# Altium PCB IT_SENSOR_PCB.PcbDoc (part 2 of 2)
Units mm, origin at the board's own origin, x right, y up, seen from the top; angles counter-clockwise.
Board outline 100 x 100 mm, 4 copper layers (Top Layer, GND, POWER, Bottom Layer), stack 1.576 mm thick; 106 components, 76 nets, 394 pads, 164 vias.
Unrouted connection lines stored in the file: 43.
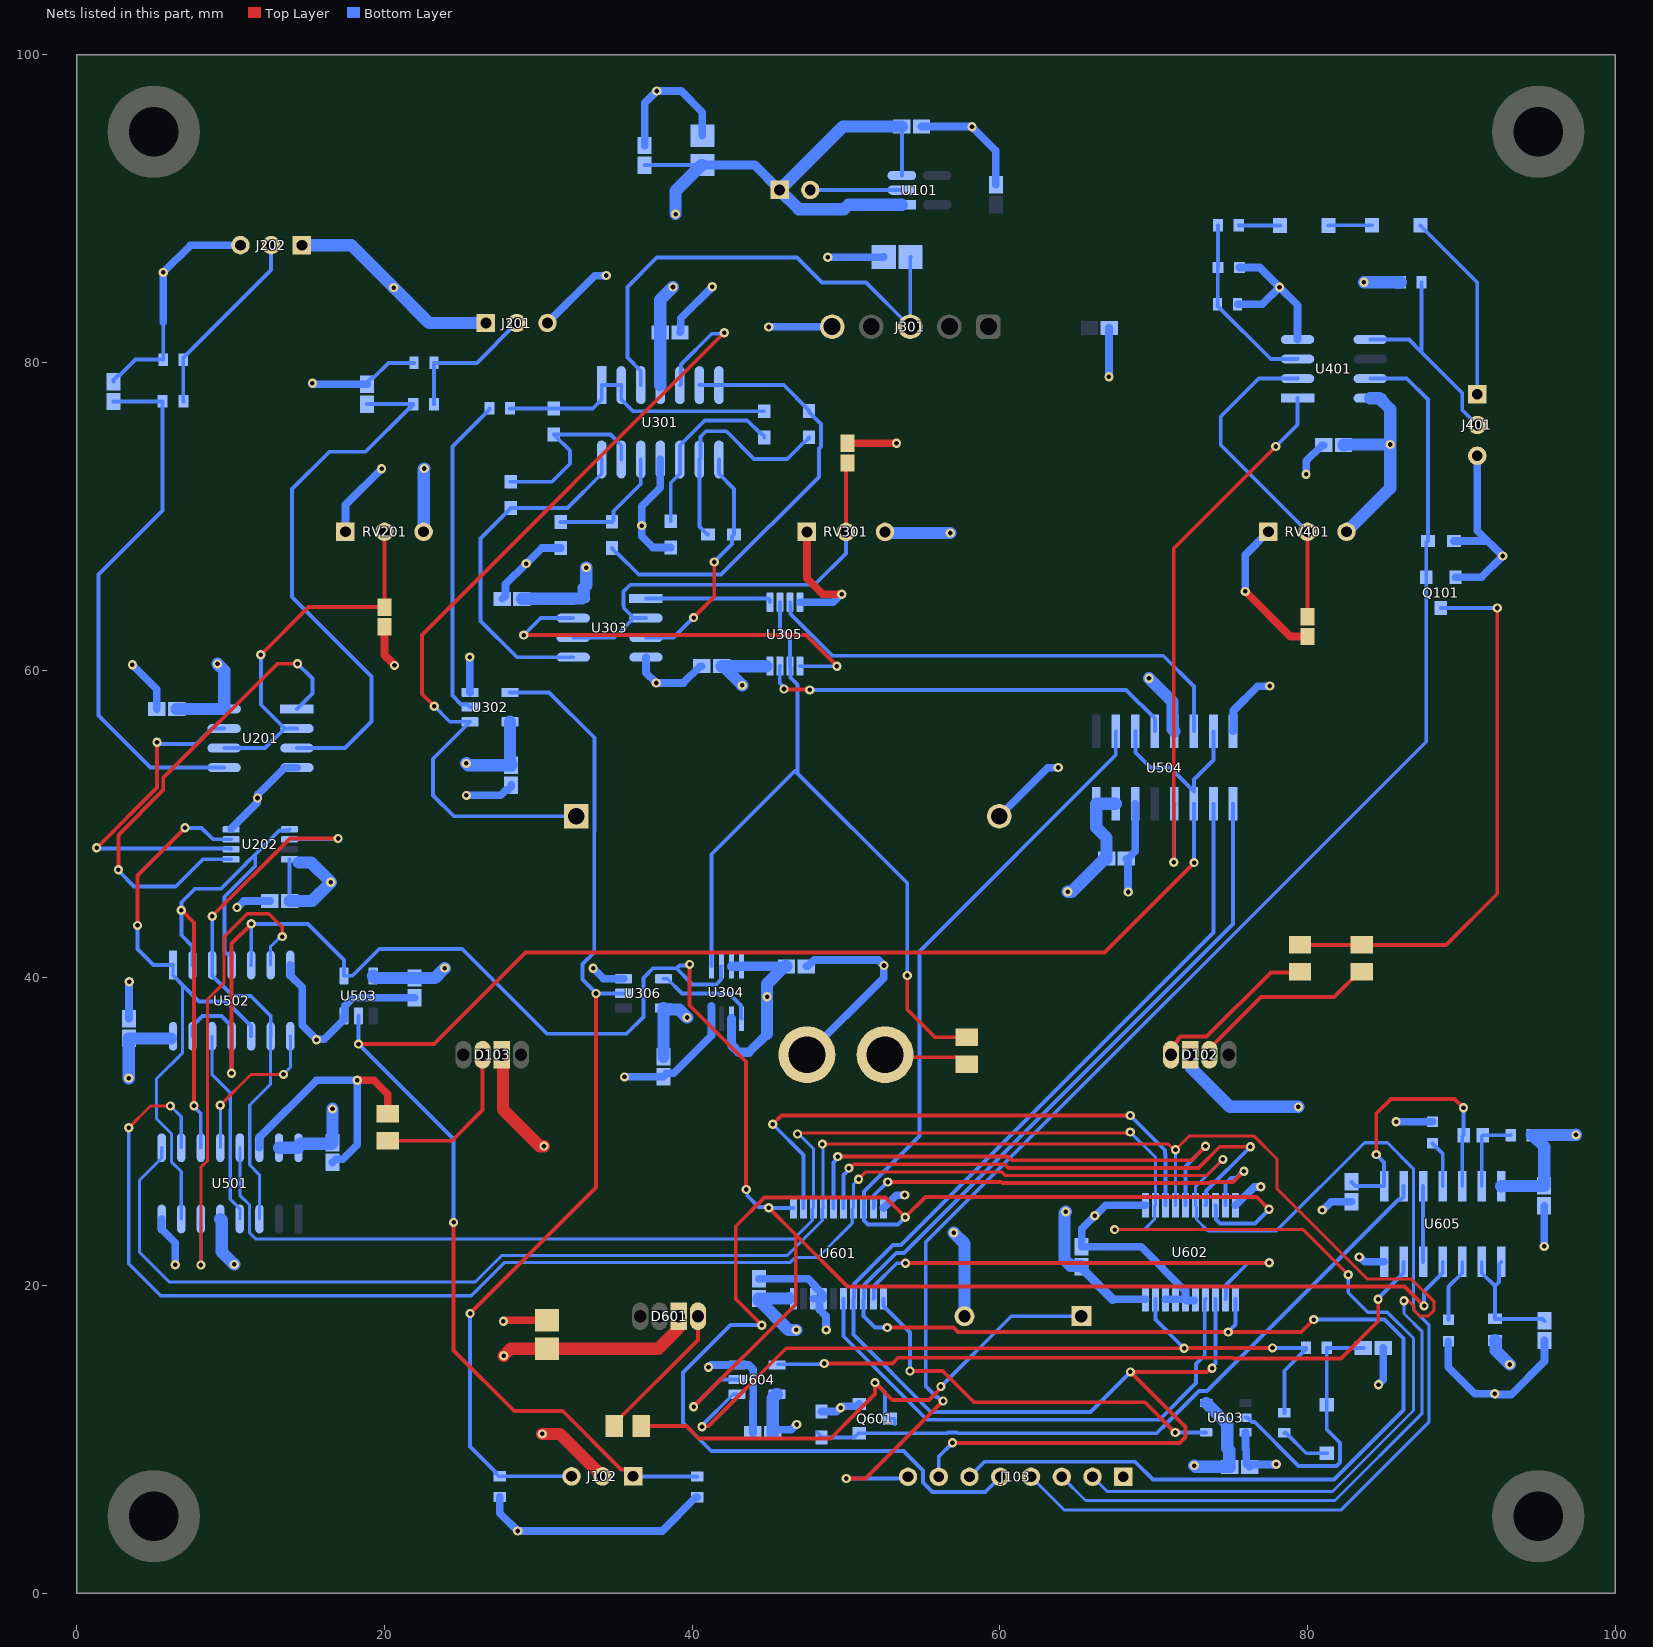
[diagram p4: the nets of this part, all layers, seen from the top]

## Via types
v1: diameter 0.6, hole 0.3, Top Layer to Bottom Layer, 164 vias

## Nets (pads, with @x,y where several pads share a name; then routed paths per layer and width w, separated by ;. In a path a pad name is that pad's centre, name@x,y a point inside that pad or via, vN(x,y) a via of type N, cw(c..) or ccw(c..) an arc to the next point about the centre after c; other vN are vias at no path point) (continued)
+5V: BZ601.2 C101.1 C103.2 C104.1 C204.1 C205.1 C304.1 C305.1 C307.1 C308.1 C309.1 C310.1 C403.1 C501.1 C502.1 C503.1 C504.1 C601.1 C602.1 C604.1 C605.1 C606.1 C611.1 D102.1 D103.1 D601.1 J101.1 J102.2 J201.1 J202.1 R403.2 R602.1 R603.1 RV201.3 RV301.3 RV401.3 U101.1 U101.3 U201.8 U202.8 U301.4 U302.5 U303.8 U304.2 U304.7 U304.8 U305.8 U306.5 U401.8 U501.5 U501.15 U501.16 U502.14 U503.5 U504.5 U504.15 U504.16 U601.20 U602.20 U603.5 U604.5 U605.14 | length 239.7
  Top Layer w0.8: D103.1@27.625,35 27.696,34.929 27.696,31.434 30.07,29.06 v1(30.37,29.06) ; v1(27.75,15.43) 28.214,15.894 C611.1@30.56,15.894 37.812,15.894 39.054,17.137 39.054,17.929 D601.1@39.125,18 ; v1(30.26,10.35) 31.4,10.35 J102.2@34.16,7.59
  Bottom Layer w0.25: U502.14@6.115,36.059 6.25,36.194 U502.14@6.25,36.2 ; C205.1@13.83,44.99 U202.8@13.83,47.705 ; C104.1@36.91,92.829 36.921,92.84 C103.2@40.66,92.84 ; U101.3@53.63,92.16 C101.1@53.629,95.35
  Bottom Layer w0.5: C605.1@45.231,10.41 45.437,10.616 46.429,10.616 46.773,10.96 v1(46.8,10.96) ; 67.33,19.11 U602.20@69.465,19.11
  Bottom Layer w0.6: C103.2@40.66,92.84 44.06,92.84 J101.1@45.68,91.22 ; U304.2@42.555,37.35 42.555,35.635 43.024,35.166 43.686,35.166 44.87,36.35 ; U304.7@42.555,40.75 U304.8@43.205,40.75 C308.1@46.129,40.75 ; C602.1@65.32,21.12 67.33,19.11
  Bottom Layer w0.8: v1(3.37,33.48) 3.37,36.052 C502.1@3.377,36.059 U502.14@6.115,36.059 ; C204.1@6.481,57.48 6.483,57.478 9.574,57.478 U201.8@9.576,57.475 9.576,59.974 v1(9.14,60.41) ; U501.5@9.325,24.324 9.413,24.236 9.413,22.187 v1(10.23,21.37) ; U501.15@13.135,28.956 U501.16@14.405,28.956 14.405,29.09 14.534,29.218 16.564,29.218 16.62,29.275 v1(16.62,31.48) ; C205.1@13.83,44.99 15.29,44.99 v1(16.51,46.21) 15.219,47.501 14.42,47.501 ; J202.1@14.63,87.63 17.84,87.63 v1(20.6,84.87) 22.9,82.57 J201.1@26.59,82.57 ; U503.5@19.26,40.13 19.26,40.091 19.36,39.991 C503.1@21.96,39.991 23.271,39.991 v1(23.91,40.63) ; RV201.3@22.54,68.995 22.54,73.07 v1(22.58,73.11) ; v1(25.31,53.94) 25.439,53.811 C305.1@28.23,53.811 28.23,53.92 28.16,53.99 U302.5@28.16,56.65 ; C307.1@28.931,64.64 28.938,64.647 32.259,64.647 U303.8@32.266,64.655 32.842,64.655 32.951,64.764 32.951,65.34 33.11,65.499 v1(33.11,66.67) ; U301.4@37.93,78.53 C304.1@37.929,81.96 37.929,84.089 v1(38.75,84.91) ; C310.1@38.13,34.861 U306.5@38.13,38.04 38.23,37.94 39.15,37.94 v1(39.67,37.42) ; v1(38.92,89.65) 38.92,91.15 40.61,92.84 C103.2@40.66,92.84 ; v1(43.26,59.01) 43.26,59.02 42.02,60.26 C309.1@41.911,60.26 41.916,60.265 44.82,60.265 ; 44.87,36.35 v1(44.87,38.77) 44.87,39.6 46.02,40.75 C308.1@46.129,40.75 ; C605.1@45.231,10.41 45.231,12.691 45.47,12.93 U604.5@45.52,12.93 ; 46.3,19.18 46.269,19.149 C601.1@44.334,19.149 44.334,19.04 46.264,17.11 v1(46.76,17.11) ; RV301.3@52.54,68.99 52.61,68.92 v1(56.77,68.92) ; U101.1@53.63,90.26 50.165,90.26 49.871,89.966 46.934,89.966 J101.1@45.68,91.22 49.81,95.35 C101.1@53.629,95.35 ; v1(57,23.42) 57.7,22.72 BZ601.2@57.7,18 ; v1(64.29,24.79) 64.21,24.71 64.21,21.674 64.593,21.291 65.264,21.291 65.32,21.235 C602.1@65.32,21.229 ; v1(64.42,45.59) 64.67,45.59 66.83,47.75 C504.1@66.939,47.75 66.939,49.107 66.27,49.777 U504.16@66.27,51.31 U504.15@67.54,51.31 ; v1(69.7,59.48) 71.229,57.951 71.229,56.155 U504.5@71.35,56.034 ; D102.1@72.375,35 72.446,34.929 72.446,34.137 74.973,31.61 v1(79.41,31.61) ; v1(72.64,8.29) 72.72,8.21 C604.1@74.96,8.21 74.921,8.249 74.921,9.289 74.79,9.42 74.79,10.99 U603.5@73.42,12.36 ; C403.1@82.341,74.63 82.381,74.67 v1(85.38,74.67) ; RV401.3@82.54,68.995 85.38,71.835 v1(85.38,74.67) ; v1(83.67,85.22) R403.2@86.067,85.22 ; U401.8@84.084,77.685 84.659,77.685 85.38,76.964 v1(85.38,74.67) ; R602.1@92.19,16.43 92.24,16.38 92.24,15.77 v1(93.15,14.86) ; U605.14@92.6,26.46 92.605,26.465 95.385,26.465 C606.1@95.39,26.47 95.39,29.021 94.631,29.78 R603.1@94.567,29.78 97.45,29.78 v1(97.46,29.79)
ALERT_3S_TIMING: C607.1 R602.2 U605.1 U605.2 | length 9.1
  Bottom Layer w0.25: U605.2@91.33,21.532 91.33,20.821 92.19,19.961 ; U605.1@92.6,21.532 92.446,21.378 92.446,20.217 92.19,19.961 ; C607.1@95.41,17.701 95.281,17.83 R602.2@92.19,17.83 92.19,19.961
ALERT_BLINK: Q601.1 R605.1 U605.9 | length 45.5
  Bottom Layer w0.25: R605.1@48.135,10.435 48.41,10.16 R605.1@48.41,10.11 50.53,10.11 50.81,10.39 Q601.1@50.86,10.39 56.58,10.39 56.639,10.449 57.201,10.449 57.26,10.39 70.18,10.39 70.556,10.766 70.579,10.766 72.952,13.139 73.465,13.139 85.92,25.594 86.096,25.594 86.25,25.749 U605.9@86.25,26.46
ALERT_BLINK_TIMING: C609.1 R604.1 U605.8 U605.12 | length 18.6
  Top Layer w0.25: v1(84.47,28.51) 84.47,31.18 85.42,32.13 89.57,32.13 v1(90.14,31.56)
  Bottom Layer w0.25: C609.1@82.86,26.73 83.13,26.46 U605.8@84.98,26.46 84.98,28 v1(84.47,28.51) ; U605.12@90.06,26.46 90.06,29.675 R604.1@90.155,29.77 90.14,29.785 v1(90.14,31.56)
ALERT_LOAD_N: BZ601.1 Q601.3 R606.2 | length 37.1
  Top Layer w0.25: R606.2@36.685,10.87 39.62,10.87 40.43,10.06 49.01,10.06 50.755,11.805 51.885,12.935 v1(51.885,13.685) 53.01,12.56 55.4,12.56 55.859,13.019 55.859,13.024 56.17,13.335 v1(56.17,13.43)
  Bottom Layer w0.25: v1(51.885,13.685) 52.535,13.035 52.535,11.615 52.81,11.34 Q601.3@52.86,11.34 53.17,11.34 Q601.3@53.17,11 ; v1(56.17,13.43) 60.74,18 BZ601.1@65.3,18
ALERT_TRIG_N: U604.4 U605.6 | length 44.6
  Top Layer w0.25: v1(48.59,14.93) 53.02,14.93 53.389,15.299 75.146,15.299 ; 75.184,15.261 82.181,15.261 84.6,17.68 v1@84.6,19.1
  Bottom Layer w0.25: U604.4@45.57,14.88 v1@48.54,14.88 ; v1@84.59,19.161 86.25,20.821 U605.6@86.25,21.532
  other v1: 84.59,19.11
ALERT_WINDOW: U605.5 U605.10 | length 4.9
  Bottom Layer w0.25: U605.5@87.52,21.532 U605.10@87.52,26.46
BLINK_DISCH: R603.2 R604.2 U605.13 | length 5.2
  Bottom Layer w0.25: U605.13@91.33,26.46 91.33,29.695 R604.2@91.405,29.77 93.203,29.77 R603.2@93.213,29.78
DISP_A_FILT: C201.1 R203.2 U201.3 | length 36
  Bottom Layer w0.25: U201.3@14.304,54.935 17.435,54.935 19.16,56.66 19.16,59.58 13.99,64.75 13.99,71.77 16.42,74.2 18.767,74.2 21.586,77.019 21.662,77.019 21.867,77.223 R203.2@21.867,77.3 C201.1@18.86,77.3
DISP_A_HIGH: U201.1 U202.1 | length 31.3
  Top Layer w0.25: v1(2.7,47.03) 2.7,49.294 5.61,52.204 5.61,53 13.03,60.42 v1(14.34,60.42)
  Bottom Layer w0.25: v1(2.7,47.03) 2.7,46.96 3.72,45.94 6.43,45.94 8.195,47.705 U202.1@10.03,47.705 ; U201.1@14.304,57.475 15.31,58.481 15.31,59.45 v1(14.34,60.42)
DISP_A_RAW: J201.2 R201.1 R203.1 | length 9.1
  Bottom Layer w0.25: R203.1@23.22,77.3 23.215,77.305 23.215,79.975 R201.1@23.21,79.98 26,79.98 J201.2@28.59,82.57
DISP_B_FILT: C202.1 R204.2 U201.5 | length 34.9
  Bottom Layer w0.25: C202.1@2.37,77.469 5.566,77.469 5.567,70.387 1.41,66.23 1.41,57.05 4.78,53.68 9.561,53.68 U201.5@9.576,53.665
DISP_B_HIGH: U201.7 U202.2 | length 22.1
  Top Layer w0.25: v1(1.28,48.45) 1.29,48.45 5.21,52.37 v1(5.21,55.31)
  Bottom Layer w0.25: v1(1.28,48.45) 1.327,48.403 9.982,48.403 U202.2@10.03,48.355 ; v1(5.21,55.31) 5.32,55.2 7.778,55.2 8.783,56.205 U201.7@9.576,56.205
DISP_B_RAW: J202.2 R202.1 R204.1 | length 12.5
  Bottom Layer w0.25: R204.1@6.92,77.47 6.915,77.475 6.915,80.285 6.91,80.29 12.63,86.01 J202.2@12.63,87.63
DISP_CENTER_N: U202.3 U501.7 U502.1 U502.10 | length 39.6
  Top Layer w0.25: v1(3.94,43.41) 3.94,46.66 v1(7.03,49.75)
  Bottom Layer w0.2: U502.1@6.25,40.166 U502.1@6.25,40.832 ; U501.7@6.785,24.324 6.785,27.406 6.14,28.051 6.14,29.881 5.18,30.841 5.18,33.44 6.875,35.135 6.875,39.541
  Bottom Layer w0.25: v1(3.94,43.41) 3.94,41.87 4.98,40.83 6.248,40.83 U502.1@6.25,40.832 ; U502.1@6.25,40.166 6.875,39.541 7.945,38.471 9.725,38.471 11.33,36.866 U502.10@11.33,36.2 ; v1(7.03,49.75) 8.11,49.75 8.855,49.005 U202.3@10.03,49.005
DISP_CENTER_RST_N: U501.6 U502.6 | length 32.6
  Top Layer w0.2: v1(8.06,21.33) 8.06,27.68 8.49,28.11 8.49,38.6 9.571,39.681 9.571,42.666 11.069,44.164 12.476,44.164 13.35,43.29 v1(13.35,42.68)
  Bottom Layer w0.2: U501.6@8.055,24.324 8.058,24.321 8.058,21.332 v1(8.06,21.33) ; U502.6@12.6,40.832 12.6,42.053 12.717,42.17 12.732,42.17 13.242,42.68 v1(13.35,42.68)
DISP_LEFT_N: U202.6 U501.3 U502.3 U502.9 | length 36.2
  Top Layer w0.25: v1(8.8,44.01) 13.85,49.06 v1(16.98,49.06)
  Bottom Layer w0.2: U501.3@11.865,24.324 11.865,27.202 11.24,27.827 11.24,31.737 12.6,33.097 U502.9@12.6,36.2
  Bottom Layer w0.25: v1(8.8,44.01) 8.795,44.005 8.795,40.161 10.145,38.811 11.301,38.811 12.6,37.512 U502.9@12.6,36.2 ; U202.6@13.83,49.005 13.857,49.033 16.953,49.033 v1(16.98,49.06)
DISP_LEFT_RST_N: U501.4 U502.12 | length 12.6
  Bottom Layer w0.2: U502.12@8.79,36.2 8.79,33.7 9.97,32.52 9.97,31.995 9.974,31.991 9.974,31.449 9.97,31.445 9.97,25.615 10.595,24.99 U501.4@10.595,24.324
DISP_RIGHT_N: U202.5 U501.11 U502.2 U502.4 | length 37.7
  Top Layer w0.25: v1(6.79,44.4) 7.61,43.58 v1(7.61,31.68)
  Bottom Layer w0.25: U502.2@7.52,40.832 7.52,42.04 6.79,42.77 6.79,44.91 7.67,45.79 9.358,45.79 10.694,47.126 10.708,47.126 10.959,47.377 10.959,47.391 11.596,48.028 ; v1(7.61,31.68) 7.61,31.615 8.055,31.17 U501.11@8.055,28.956 ; U502.4@10.06,40.832 10.06,41.419 9.925,41.554 9.77,41.554 9.59,41.734 9.59,45.27 11.596,47.276 11.596,48.028 ; U202.5@13.83,49.655 13.759,49.584 13.152,49.584 11.596,48.028
DISP_RIGHT_RST_N: U501.12 U502.8 | length 10.4
  Top Layer w0.2: v1(9.32,31.72) 11.32,33.72 v1(13.43,33.72)
  Bottom Layer w0.2: v1(9.32,31.72) 9.323,31.717 9.323,28.959 U501.12@9.325,28.956 ; v1(13.43,33.72) 13.875,34.165 13.875,36.195 U502.8@13.87,36.2
DISP_VTH: C203.1 RV201.2 U201.2 U201.6 | length 24.9
  Top Layer w0.25: v1(11.96,61) 15.06,64.1 C203.1@20,64.1 RV201.2@20,68.995
  Bottom Layer w0.25: U201.6@9.576,54.935 12.24,54.935 U201.2@13.51,56.205 ; v1(11.96,61) 11.96,57.755 U201.2@13.51,56.205 ; U201.2@14.304,56.205 U201.2@13.51,56.205
FAULT_LED_N: Q101.3 R104.1 R105.2 | length 36.4
  Top Layer w0.25: R104.1@79.52,42.14 R105.2@83.52,42.14 89.01,42.14 92.34,45.47 v1(92.34,64.04)
  Bottom Layer w0.25: Q101.3@88.67,64.04 v1(92.34,64.04)
GND: C101.2 C102.2 C103.1 C104.2 C201.2 C202.2 C203.2 C204.2 C205.2 C301.2 C302.2 C303.2 C304.2 C305.2 C306.2 C307.2 C308.2 C309.2 C310.2 C401.2 C402.2 C403.2 C501.2 C502.2 C503.2 C504.2 C601.2 C602.2 C603.2 C604.2 C605.2 C606.2 C607.2 C608.2 C609.2 C610.2 C611.2 D101.K J101.2 J103.1 J201.3 J202.3 J301.5 J401.3 Q101.2 Q601.2 R101.2 R102.2 R106.2 R107.1 R201.2 R202.2 R303.2 R307.2 R402.2 R605.2 RV201.1 RV301.1 RV401.1 U101.2 U201.4 U202.4 U301.11 U302.3 U303.4 U304.4 U305.4 U306.3 U401.4 U501.8 U501.14 U502.7 U503.3 U504.8 U504.14 U601.10 U601.17 U601.18 U602.1 U602.10 U602.15 U602.16 U602.17 U602.18 U603.3 U604.3 U605.7 | length 316.1
  Top Layer w0.5: v1(18.23,33.34) 19.31,33.34 20.21,32.44 R106.2@20.21,31.155 ; C203.2@20,62.819 20,60.987 20.65,60.337 v1(20.65,60.31) ; v1(27.73,17.67) 27.757,17.67 27.833,17.746 C611.2@30.56,17.746 ; RV301.1@47.46,68.99 47.46,65.97 48.5,64.93 v1(49.72,64.93) ; C306.2@50.11,74.75 v1(53.28,74.75) ; v1(75.95,65.12) 78.881,62.189 C402.2@80.01,62.189
  Bottom Layer w0.25: C202.2@2.37,78.751 2.37,78.86 2.701,79.191 2.811,79.191 3.809,80.19 R202.2@5.61,80.19 5.61,82.61 ; C201.2@18.86,78.691 19.191,79.022 19.301,79.022 20.259,79.98 R201.2@21.91,79.98 ; J101.2@47.68,91.22 47.685,91.215 53.625,91.215 U101.2@53.63,91.21
  Bottom Layer w0.5: C502.2@3.377,37.341 3.389,37.352 3.389,39.729 v1(3.4,39.74) ; v1(3.61,60.35) 5.199,58.761 C204.2@5.199,57.48 ; U501.8@5.515,24.324 5.515,23.658 6.4,22.773 v1(6.4,21.35) ; 5.61,82.61 5.62,82.62 v1(5.62,85.86) 7.39,87.63 J202.3@10.63,87.63 ; U202.4@10.03,49.655 10.03,49.705 11.721,51.396 11.721,51.671 v1(11.74,51.69) 11.759,51.709 11.759,51.914 13.51,53.665 U201.4@14.304,53.665 ; v1(10.41,44.57) 10.437,44.57 10.857,44.99 C205.2@12.549,44.99 ; U501.14@11.865,28.956 11.865,29.622 15.583,33.34 v1(18.23,33.34) 18.23,29.156 17.285,28.21 16.826,28.21 16.62,28.004 C501.2@16.62,27.999 ; U502.7@13.87,40.832 13.884,40.818 13.884,40.152 14.645,39.391 14.645,36.915 v1(15.58,35.98) 15.599,35.999 16.079,35.999 17.36,37.28 U503.3@17.36,37.53 17.41,37.58 17.41,38.163 17.957,38.709 C503.2@21.96,38.709 ; v1(15.31,78.66) 15.337,78.66 15.416,78.581 C201.2@18.86,78.581 ; RV201.1@17.46,68.995 17.46,70.75 v1(19.81,73.1) ; v1(25.32,51.86) 27.561,51.86 27.914,52.214 28.024,52.214 28.23,52.42 C305.2@28.23,52.529 ; v1(25.54,60.85) 25.55,60.84 25.55,58.56 U302.3@25.56,58.55 ; R102.2@27.5,6.243 27.5,5.2 v1(28.66,4.04) 38.05,4.04 40.243,6.233 R101.2@40.32,6.233 ; C307.2@27.649,64.64 27.655,64.64 27.861,64.846 27.861,65.581 v1(29.21,66.93) 30.22,67.94 R307.2@31.45,67.94 ; J201.3@30.59,82.57 33.661,85.641 34.391,85.641 v1(34.41,85.66) ; v1(33.56,40.62) 34.24,39.94 U306.3@35.53,39.94 ; v1(35.6,33.56) 35.61,33.57 38.12,33.57 C310.2@38.13,33.579 38.13,33.585 38.336,33.791 38.795,33.791 41.251,36.247 41.251,38.17 ; C104.2@36.91,94.111 36.91,96.87 v1(37.69,97.65) 39.29,97.65 40.66,96.28 C103.1@40.66,94.74 ; U303.4@36.994,60.845 36.994,59.836 v1(37.66,59.17) 39.43,59.17 40.52,60.26 C309.2@40.629,60.26 ; U301.11@37.93,73.698 37.93,71.86 36.72,70.65 36.72,68.7 37.44,67.98 R303.2@38.61,67.98 ; C304.2@39.211,81.96 39.263,82.013 39.263,82.873 v1@41.291,84.901 ; v1(41.06,14.69) 41.087,14.69 41.227,14.83 U604.3@42.92,14.83 43.68,14.83 43.974,14.536 43.974,12.451 43.949,12.427 C605.2@43.949,10.41 ; C601.2@44.334,20.431 47.547,20.431 47.987,19.99 47.987,19.933 48.529,19.391 U601.17@48.529,19.14 U601.18@47.879,19.14 ; v1(44.98,82.31) 44.99,82.32 49.09,82.32 J301.5@49.1,82.33 ; U305.4@47.005,64.415 49.178,64.415 49.693,64.93 v1(49.72,64.93) ; C308.2@47.411,40.75 47.52,40.75 47.93,41.16 52.11,41.16 v1(52.47,40.8) 52.451,40.781 52.451,39.991 D101.K@47.46,35 ; 48.28,18.86 48.28,18.43 48.701,18.009 48.701,17.129 v1(48.72,17.11) ; R605.2@48.41,11.81 49.383,11.81 49.623,12.05 v1(49.65,12.05) 49.677,12.05 49.767,12.14 50.71,12.14 Q601.2@50.86,12.29 ; v1(48.82,86.85) 52.452,86.85 C301.2@52.462,86.86 ; U601.10@52.429,25.04 52.454,25.04 53.275,25.861 53.801,25.861 v1(53.82,25.88) ; C101.2@54.911,95.35 54.921,95.34 58.18,95.34 59.74,93.78 C102.2@59.74,91.551 ; C303.2@59.96,50.5 63.111,53.651 63.781,53.651 v1(63.8,53.67) ; v1(67.09,79.08) 67.101,79.091 67.101,82.239 C302.2@67.111,82.25 ; v1(68.35,45.58) 68.331,45.599 68.331,47.64 C504.2@68.221,47.75 68.33,47.75 68.81,48.23 U504.14@68.81,51.31 ; U602.1@69.465,25.21 66.877,25.21 66.197,24.53 v1(66.17,24.53) 65.32,23.68 C602.2@65.32,22.511 69.189,22.511 72.065,19.635 U602.16@72.065,19.11 ; U602.18@70.765,19.11 U602.17@71.415,19.11 U602.16@72.065,19.11 ; U602.15@72.63,19.02 72.155,19.02 U602.16@72.065,19.11 ; U504.8@75.16,56.034 75.189,56.064 75.189,57.379 76.761,58.951 77.531,58.951 v1(77.55,58.97) ; U602.10@75.315,25.21 75.34,25.21 76.531,26.401 76.941,26.401 v1(76.96,26.42) ; R402.2@75.46,83.78 77.07,83.78 v1(78.18,84.89) ; C401.2@75.58,86.18 76.89,86.18 v1(78.18,84.89) ; v1(75.95,65.12) 75.95,67.485 RV401.1@77.46,68.995 ; U603.3@75.97,10.46 75.97,9.37 76.03,9.31 76.03,8.416 76.236,8.21 C604.2@76.241,8.21 76.392,8.361 77.951,8.361 v1(77.97,8.38) ; U401.4@79.356,81.495 79.356,83.714 v1(78.18,84.89) ; v1(79.91,72.73) 79.929,72.749 79.929,73.609 80.95,74.63 C403.2@81.059,74.63 ; v1(80.96,24.9) 80.987,24.9 81.536,25.449 C609.2@82.86,25.449 ; v1(83.37,21.85) 83.397,21.85 83.715,21.532 U605.7@84.98,21.532 ; v1@84.62,13.577 84.92,13.877 C603.2@84.92,15.94 ; v1(85.76,30.64) C610.2@88.13,30.64 ; C608.2@89.16,16.37 89.16,14.68 90.88,12.96 92.197,12.96 92.249,12.908 93.238,12.908 95.41,15.08 C607.2@95.41,16.419 ; R107.1@89.53,68.4 91.71,68.4 ; Q101.2@89.62,66.04 91.31,66.04 v1(92.69,67.42) 91.04,69.07 J401.3@91.04,73.94 ; v1(95.39,22.54) C606.2@95.39,25.189
  other v1: 92.17,12.96 84.62,13.55 36.72,69.4 41.31,84.92 58.19,95.33
NetC608_1: C608.1 U605.3 | length 4.1
  Bottom Layer w0.25: C608.1@89.16,17.77 89.16,19.921 90.06,20.821 U605.3@90.06,21.532
NetC610_1: C610.1 U605.11 | length 3.1
  Bottom Layer w0.25: C610.1@88.13,29.24 88.79,28.58 U605.11@88.79,26.46
NetD101_A: D101.A R103.2 | length 5.6
  Top Layer w0.25: D101.A@52.54,35 52.705,34.835 57.4,34.835 R103.2@57.85,34.385
NetD102_2: D102.2 R104.2 | length 10.9
  Top Layer w0.25: D102.2@71.125,35 71.125,35.471 71.575,35.921 71.575,36.014 71.736,36.175 73.445,36.175 77.625,40.355 R104.2@79.485,40.355
NetD102_3: D102.3 R105.1 | length 12.4
  Top Layer w0.25: D102.3@73.625,35 73.625,35.403 76.972,38.75 81.73,38.75 83.37,40.39 R105.1@83.52,40.39
NetD103_3: D103.3 R106.1 | length 10.6
  Top Layer w0.25: R106.1@20.21,29.405 24.375,29.405 26.38,31.41 26.38,34.995 D103.3@26.375,35
NetD401_2: D401.2 D402.1 | length 2.8
  Bottom Layer w0.25: D402.1@81.37,88.91 81.38,88.92 D401.2@84.205,88.92
NetD402_2: D402.2 R401.1 | length 2.7
  Bottom Layer w0.25: R401.1@75.537,88.91 D402.2@78.22,88.91
NetD601_2: D601.2 R606.1 | length 9.4
  Top Layer w0.25: R606.1@34.935,10.87 34.935,11.02 40.375,16.46 D601.2@40.375,18
NetD602_2: D602.2 R607.1 | length 3.3
  Bottom Layer w0.25: R607.1@78.5,10.42 78.6,10.42 79.925,9.095 D602.2@81.26,9.095
NetR301_2: R301.2 U302.2 | length 21.1
  Bottom Layer w0.25: U302.2@25.56,57.6 25.385,57.775 24.979,57.775 24.41,58.344 24.41,74.54 26.813,76.943 R301.2@26.813,77.02
NetR302_2: R302.2 R303.1 U301.10 | length 11.8
  Bottom Layer w0.25: R303.1@38.61,69.68 38.61,72.182 39.2,72.772 U301.10@39.2,73.698 39.2,74.624 40.816,76.24 43.58,76.24 44.365,75.455 44.415,75.455 44.69,75.18 R302.2@44.69,75.13
NetR304_2: R304.2 R305.1 U301.9 | length 15.2
  Bottom Layer w0.25: R305.1@41.03,68.82 40.98,68.82 40.47,69.33 U301.9@40.47,73.698 40.541,73.769 40.541,75.171 40.9,75.53 42.22,75.53 44.02,73.73 46.18,73.73 47.265,74.815 47.315,74.815 47.59,75.09 R304.2@47.59,75.14
NetR306_2: R306.2 R307.1 U301.12 | length 8.2
  Bottom Layer w0.25: R307.1@31.45,69.64 34.78,69.64 34.889,69.749 34.889,70.329 36.66,72.1 U301.12@36.66,73.698
NetR308_2: R308.2 R309.1 U301.13 | length 12.3
  Bottom Layer w0.25: R309.1@28.2,72.25 30.88,72.25 32.05,73.42 32.05,74.27 R308.2@31,75.32 31.006,75.314 34.7,75.314 35.39,74.624 U301.13@35.39,73.698
PREV_DISP_CENTER: U601.5 U602.5 | length 32.2
  Top Layer w0.25: v1(49.47,28.38) 60.513,28.38 60.752,28.141 72.466,28.141 73.37,29.045 v1(73.37,29.05)
  Bottom Layer w0.25: U601.5@49.179,25.04 49.179,27.994 49.47,28.285 v1(49.47,28.38) ; U602.5@72.065,25.21 72.065,27.745 v1(73.37,29.05)
PREV_DISP_LEFT: U601.2 U602.3 | length 36.5
  Top Layer w0.25: v1(45.24,30.48) 45.81,31.05 v1(68.48,31.05)
  Bottom Layer w0.25: v1(45.24,30.48) 47.229,28.491 U601.2@47.229,25.04 ; v1(68.48,31.05) 70.741,28.789 70.741,28.539 70.765,28.515 U602.3@70.765,25.21
PREV_DISP_RIGHT: U601.6 U602.7 | length 34.6
  Top Layer w0.25: v1(50.19,27.63) 50.265,27.63 50.511,27.876 60.305,27.876 60.551,27.63 72.49,27.63 72.497,27.637 72.917,27.637 74.3,29.02 v1(76.29,29.02)
  Bottom Layer w0.25: U601.6@49.829,25.04 49.829,27.174 50.19,27.535 v1(50.19,27.63) ; U602.7@73.365,25.21 73.411,25.256 73.411,26.141 v1(76.29,29.02)
PREV_TILT_LEFT: U601.9 U602.9 | length 28.5
  Top Layer w0.25: v1(52.72,26.73) 60.096,26.73 60.154,26.672 73.659,26.672 73.717,26.73 75.17,26.73 v1(75.87,27.43)
  Bottom Layer w0.25: U601.9@51.779,25.04 51.825,25.086 51.825,25.868 52.687,26.73 v1(52.72,26.73) ; U602.9@74.665,25.21 74.665,26.625 75.034,26.994 75.351,26.994 75.787,27.43 v1(75.87,27.43)
PREV_TILT_RIGHT: U601.12 U602.12 | length 31.5
  Top Layer w0.25: v1(53.87,21.44) 53.89,21.46 77.49,21.46 v1(77.51,21.48)
  Bottom Layer w0.25: U601.12@51.779,19.14 51.825,19.186 51.825,19.968 53.297,21.44 v1(53.87,21.44) ; U602.12@74.665,19.11 74.711,19.156 74.711,20.038 76.153,21.48 v1(77.51,21.48)
PREV_VIBRATION: U601.15 U602.14 | length 34.3
  Bottom Layer w0.25: U601.15@49.829,19.14 49.829,16.701 55.26,11.27 70.37,11.27 72.761,13.661 72.761,14.901 73.319,15.459 73.319,19.064 U602.14@73.365,19.11
REF_OK: R103.1 U304.5 U305.2 U305.6 | length 49.7
  Top Layer w0.25: v1(53.98,40.15) 53.98,37.94 55.785,36.135 R103.1@57.85,36.135
  Bottom Layer w0.25: U304.5@41.255,40.75 41.255,48.032 46.68,53.458 46.85,53.288 ; U305.2@45.705,64.415 45.705,62.688 46.355,62.038 U305.6@46.355,60.265 46.401,60.219 46.401,59.509 46.85,59.06 46.85,53.288 ; v1(53.98,40.15) 53.98,46.157 46.85,53.288
REF_SET: J102.3 R102.1 U302.4 U306.2 | length 66
  Top Layer w0.25: v1(25.56,18.18) 33.75,26.37 v1(33.75,38.98)
  Bottom Layer w0.25: v1(25.56,18.18) 25.56,9.537 27.219,7.878 27.219,7.801 27.423,7.597 R102.1@27.5,7.597 27.503,7.593 32.157,7.593 J102.3@32.16,7.59 ; U302.4@28.16,58.55 30.7,58.55 33.639,55.611 33.639,49.543 33.63,49.534 33.63,41.65 32.881,40.901 32.881,39.885 33.776,38.99 U306.2@35.53,38.99
REF_SET_N: U304.1 U306.4 | length 6.6
  Bottom Layer w0.25: U306.4@38.13,39.94 38.38,39.94 39.332,38.988 42.403,38.988 43.18,38.211 43.18,37.375 U304.1@43.205,37.35
RESET: J102.1 R101.1 U503.2 U504.3 U504.7 U504.11 | length 117.3
  Top Layer w0.25: v1(18.31,35.69) 23.21,35.69 29.163,41.643 66.813,41.643 72.63,47.46 v1(72.63,47.49) ; v1(24.49,24.1) 24.49,15.78 28.434,11.836 31.584,11.836 35.38,8.04 35.71,8.04 J102.1@36.16,7.59
  Bottom Layer w0.25: U503.2@18.31,37.53 v1(18.31,35.69) 24.49,29.51 v1(24.49,24.1) ; J102.1@36.16,7.59 36.163,7.587 R101.1@40.32,7.587 ; U504.3@68.81,56.034 68.81,54.66 69.798,53.672 71.071,53.672 72.62,52.123 72.62,52.9 73.89,54.17 U504.7@73.89,56.034 ; U504.11@72.62,51.31 72.625,51.305 72.625,47.495 v1(72.63,47.49)
RESET_N: U304.6 U502.5 U502.11 U502.13 U503.4 U601.1 U604.2 U605.4 | length 146.9
  Top Layer w0.25: v1(10.05,33.79) 10.05,42.22 v1(11.34,43.51) ; v1(39.83,40.87) 39.83,38.22 43.51,34.54 v1(43.51,26.24) ; v1(40.09,12.12) 46.73,18.76 46.73,23.3 ; v1(44.985,25.045) 46.73,23.3 ; v1(87.58,18.67) 86.31,19.94 50.09,19.94 46.73,23.3
  Bottom Layer w0.25: U502.13@7.52,36.2 7.52,36.866 8.17,37.516 9.41,37.516 10.06,36.866 U502.11@10.06,36.2 10.055,36.195 10.055,33.795 v1(10.05,33.79) ; U502.5@11.33,40.832 11.335,40.837 11.335,43.505 v1(11.34,43.51) 15.02,43.51 17.36,41.17 U503.4@17.36,40.13 17.904,40.13 19.654,41.88 25.05,41.88 30.57,36.36 35.73,36.36 36.83,37.46 36.83,39.996 37.453,40.619 38.983,40.619 ; v1(39.83,40.87) 39.763,40.803 39.167,40.803 38.983,40.619 ; v1(40.09,12.12) 41.85,13.88 U604.2@42.92,13.88 ; U304.6@41.905,40.75 41.88,40.725 41.88,39.889 41.562,39.571 40.031,39.571 38.983,40.619 ; v1(43.51,26.24) 43.577,26.173 43.577,25.853 44.318,25.112 44.918,25.112 v1(44.985,25.045) ; v1@44.99,25.04 U601.1@46.579,25.04 ; v1(87.58,18.67) 87.58,19.611 88.79,20.821 U605.4@88.79,21.532
RISK_MEM_DISP_CENTER: J103.3 U501.9 U601.4 U602.4 | length 146.3
  Top Layer w0.2: v1(48.465,29.192) 70.94,29.192 71.312,28.82 v1(71.42,28.82) 72.304,29.704 76.531,29.704 78.014,28.221 78.014,26.281 83.876,20.419 86.756,20.419 88.234,18.941 88.234,18.399 87.851,18.016 87.309,18.016 86.926,18.399 86.926,18.647 86.416,19.156 v1(86.27,19.01)
  Bottom Layer w0.2: U501.9@5.515,28.956 5.515,28.29 4.08,26.855 4.08,22.14 6,20.22 25.894,20.22 27.634,21.96 46.196,21.96 48.458,24.222 48.458,24.969 48.539,25.051 48.497,25.093 48.497,29.16 v1(48.465,29.192) ; J103.3@64.03,7.56 65.57,6.02 81.79,6.02 87.456,11.686 87.456,16.994 86.27,18.18 v1(86.27,19.01) ; U602.4@71.415,25.21 71.418,25.212 71.418,28.818 v1(71.42,28.82)
RISK_MEM_DISP_LEFT: J103.2 U501.13 U601.3 U602.2 | length 131.3
  Top Layer w0.2: v1(46.85,29.846) 46.912,29.908 68.418,29.908 v1(68.48,29.97) ; v1(67.46,23.63) 79.72,23.63 v1(82.65,20.7)
  Bottom Layer w0.2: U501.13@10.595,28.956 10.595,25.874 11.22,25.249 11.22,23.419 11.606,23.033 46.618,23.033 47.808,24.222 47.808,24.969 U601.3@47.879,25.04 47.879,28.901 46.934,29.846 v1(46.85,29.846) ; J103.2@66.03,7.56 66.984,6.606 81.622,6.606 86.89,11.874 86.89,16.565 85.196,18.259 83.921,18.259 82.65,19.53 v1(82.65,20.7) ; v1(67.46,23.63) 69.382,23.63 70.044,24.292 70.044,25.139 U602.2@70.115,25.21 70.115,28.335 v1(68.48,29.97)
RISK_MEM_DISP_RIGHT: J103.4 U501.10 U601.7 U602.6 | length 160.6
  Top Layer w0.2: v1(3.37,30.26) 4.78,31.67 v1(6.08,31.67) ; v1(50.82,26.91) 51.294,27.384 60.119,27.384 60.352,27.151 73.461,27.151 v1(74.505,28.195)
  Bottom Layer w0.2: v1(3.37,30.26) 3.37,21.41 5.45,19.33 25.646,19.33 27.822,21.506 46.384,21.506 46.698,21.82 48.18,21.82 50.408,24.048 50.408,24.969 U601.7@50.479,25.04 50.479,26.569 v1(50.82,26.91) ; v1(6.08,31.67) 6.785,30.965 U501.10@6.785,28.956 ; J103.4@62.03,7.56 64.2,5.39 82.17,5.39 87.91,11.13 87.91,17.415 86.887,18.438 86.887,27.594 85.201,29.28 83.703,29.28 77.975,23.552 73.526,23.552 72.786,24.292 72.786,25.139 U602.6@72.715,25.21 72.715,26.405 v1(74.505,28.195)
RISK_MEM_TILT_LEFT: J103.5 U504.2 U601.8 U602.8 | length 123.5
  Top Layer w0.25: v1(44.52,17.42) 42.83,19.11 42.83,23.85 44.704,25.724 45.266,25.724 52.566,25.724 v1(53.85,24.44) 55.16,25.75 76.7,25.75 v1(77.5,24.95)
  Bottom Layer w0.25: v1(44.52,17.42) 42.48,17.42 39.411,14.351 39.411,11.079 41.243,9.247 53.727,9.247 55.009,7.966 55.009,7.197 55.624,6.581 59.051,6.581 J103.5@60.03,7.56 ; v1(53.85,24.44) 53.371,23.961 51.426,23.961 51.175,24.212 51.175,24.994 U601.8@51.129,25.04 51.175,25.086 51.175,26.115 54.769,29.709 54.769,41.717 67.54,54.488 U504.2@67.54,56.034 ; U602.8@74.015,25.21 74.061,25.164 74.061,24.282 74.312,24.031 76.581,24.031 v1(77.5,24.95)
RISK_MEM_TILT_RIGHT: J103.6 U504.9 U601.13 U602.11 | length 117.9
  Top Layer w0.25: v1(52.68,17.26) 56.985,17.26 57.275,16.97 v1(74.85,16.97) 79.6,16.97 v1(80.41,17.78)
  Bottom Layer w0.25: v1(52.68,17.26) 51.89,17.26 51.129,18.021 U601.13@51.129,19.14 51.175,19.186 51.175,20.031 53.263,22.119 53.779,22.119 75.16,43.5 U504.9@75.16,51.31 ; J103.6@58.03,7.56 59.009,8.539 68.787,8.539 69.951,7.375 81.714,7.375 86.235,11.896 86.235,16.543 84.998,17.78 v1(80.41,17.78) ; v1(74.85,16.97) 74.85,16.995 75.315,17.46 U602.11@75.315,19.11
RISK_MEM_VIBRATION: J103.7 U504.10 U601.14 U602.13 | length 99.3
  Top Layer w0.25: v1(56.92,9.77) 56.929,9.761 71.681,9.761 72.079,10.159 72.079,10.791 v1(68.49,14.38) 73.465,14.38 73.705,14.62 v1(73.8,14.62)
  Bottom Layer w0.25: J103.7@56.03,7.56 56.03,8.88 v1(56.92,9.77) ; v1(68.49,14.38) 65.884,11.774 55.506,11.774 50.479,16.801 U601.14@50.479,19.14 50.525,19.186 50.525,20.093 53.054,22.623 53.57,22.623 73.89,42.943 U504.10@73.89,51.31 ; v1(73.8,14.62) 73.8,14.715 74.015,14.93 U602.13@74.015,19.11
RISK_MISMATCH: R601.1 R607.2 U602.19 U604.1 | length 53.4
  Top Layer w0.25: v1(40.64,10.81) 40.682,10.852 41.052,10.852 46.12,15.92 v1(71.98,15.92) ; v1@71.98,15.94 v1(77.73,15.94)
  Bottom Layer w0.25: v1(40.64,10.81) 40.64,10.9 42.67,12.93 U604.1@42.92,12.93 ; U602.19@70.115,19.11 70.115,17.785 v1(71.98,15.92) ; v1(77.73,15.94) R601.1@79.903,15.94 79.903,15.863 78.5,14.46 R607.2@78.5,11.72
RISK_UPDATE_CLK: U601.11 U603.4 | length 26.3
  Top Layer w0.25: v1(54.16,14.44) 56.29,14.44 58.32,12.41 69.43,12.41 v1(71.4,10.44)
  Bottom Layer w0.25: U601.11@52.429,19.14 52.429,18.665 54.16,16.934 v1(54.16,14.44) ; v1(71.4,10.44) 71.41,10.45 73.41,10.45 U603.4@73.42,10.46
RISK_UPDATE_DELAY: C603.1 D602.1 R601.2 U603.2 | length 17.7
  Bottom Layer w0.25: U603.2@75.97,11.41 76.095,11.41 76.391,11.114 76.57,11.114 79.418,8.266 81.892,8.266 82.114,8.488 82.114,9.775 81.257,10.633 R601.2@81.257,15.94 C603.1@83.639,15.94
SENSOR_FAULT: J103.8 Q101.1 R107.2 U401.7 | length 95.9
  Top Layer w0.25: v1(50.02,7.45) 51.27,7.45 v1(56.31,12.49)
  Bottom Layer w0.25: v1(50.02,7.45) 53.92,7.45 J103.8@54.03,7.56 ; v1(56.31,12.49) 56.215,12.49 55.954,12.751 55.889,12.751 55.18,13.46 55.18,22.807 87.72,55.347 Q101.1@87.72,66.04 87.72,68.29 R107.2@87.83,68.4 87.83,77.59 86.45,78.97 84.099,78.97 U401.7@84.084,78.955
TILT_HOLD: C303.1 U301.5 U302.1 | length 56.2
  Top Layer w0.25: v1(23.23,57.66) 22.43,58.46 22.43,62.29 v1(42.08,81.94)
  Bottom Layer w0.25: v1(23.23,57.66) 24.24,56.65 U302.1@25.56,56.65 23.15,54.24 23.15,51.86 24.51,50.5 C303.1@32.46,50.5 ; U301.5@39.2,78.53 39.263,78.593 39.263,79.863 41.273,81.873 42.013,81.873 v1(42.08,81.94)
TILT_LEFT: U305.7 U504.4 | length 27.3
  Top Layer w0.25: v1(45.97,58.78) 46,58.75 47.61,58.75 v1(47.64,58.72)
  Bottom Layer w0.25: U305.7@45.705,60.265 45.698,60.257 45.698,59.147 45.97,58.875 v1(45.97,58.78) ; v1(47.64,58.72) 68.207,58.72 70.08,56.847 U504.4@70.08,56.034
TILT_LEFT_RAW: U303.1 U305.1 | length 8.2
  Bottom Layer w0.25: U303.1@36.994,64.655 44.955,64.655 45.055,64.555 U305.1@45.055,64.415
TILT_NEG_AMP: R309.2 U301.14 U303.5 | length 22.9
  Bottom Layer w0.25: U303.5@32.266,60.845 28.595,60.845 26.25,63.19 26.25,68.55 28.2,70.5 R309.2@28.2,70.55 31.898,70.55 34.12,72.772 U301.14@34.12,73.698
TILT_POS_AMP: R305.2 U301.8 U303.3 | length 15.4
  Top Layer w0.25: v1(40.09,63.42) 41.43,64.76 v1(41.43,67.03)
  Bottom Layer w0.25: U303.3@36.994,62.115 38.785,62.115 v1(40.09,63.42) ; v1(41.43,67.03) 42.591,68.191 42.591,68.681 R305.2@42.73,68.82 42.73,71.782 41.74,72.772 U301.8@41.74,73.698
TILT_REF: R304.1 R306.1 U301.6 U301.7 | length 29.3
  Bottom Layer w0.25: R306.1@34.79,67.95 34.79,67.9 35.065,67.625 35.115,67.625 36.53,66.21 41.88,66.21 48.24,72.57 48.24,74.404 48.369,74.533 48.369,76.011 47.59,76.79 47.59,76.89 45.95,78.53 U301.7@41.74,78.53 U301.6@40.47,78.53
TILT_RIGHT: U305.3 U504.6 | length 31.9
  Bottom Layer w0.25: U305.3@46.355,64.415 46.401,64.369 46.401,63.662 49.124,60.939 70.621,60.939 72.62,58.94 U504.6@72.62,56.034
TILT_RIGHT_RAW: U303.7 U305.5 | length 27.3
  Top Layer w0.25: v1(29.05,62.28) 47.39,62.28 v1(49.41,60.26)
  Bottom Layer w0.25: v1(29.05,62.28) 30.155,63.385 U303.7@32.266,63.385 ; U305.5@47.005,60.265 47.01,60.26 v1(49.41,60.26)
TILT_VTH: C306.1 RV301.2 U303.2 U303.6 | length 28.7
  Top Layer w0.25: RV301.2@50,68.995 50,73.359 C306.1@50.11,73.469
  Bottom Layer w0.25: U303.6@32.266,62.115 34.93,62.115 U303.2@36.2,63.385 ; U303.2@36.994,63.385 U303.2@36.2,63.385 ; RV301.2@50,68.99 50,67.59 47.96,65.55 35.977,65.55 35.53,65.103 35.53,64.207 35.55,64.187 35.55,64.035 U303.2@36.2,63.385
TILT_Y_BUF: R301.1 R302.1 R308.1 U301.1 U301.2 | length 18.9
  Bottom Layer w0.25: R301.1@28.167,77.02 R308.1@31,77.02 33.536,77.02 34.12,77.604 U301.1@34.12,78.53 U301.2@35.39,78.53 35.39,77.604 36.164,76.83 R302.1@44.69,76.83
TILT_Y_RAW: C301.1 J301.3 U301.3 | length 32.3
  Bottom Layer w0.25: U301.3@36.66,78.53 36.66,79.456 35.79,80.326 35.79,84.91 37.7,86.82 46.81,86.82 48.43,85.2 51.31,85.2 J301.3@54.18,82.33 54.18,86.85 C301.1@54.19,86.86
VIB_CONN_SENSE: J401.2 R403.1 U401.5 | length 14.5
  Bottom Layer w0.25: U401.5@84.084,81.495 86.595,81.495 87.42,80.67 ; R403.1@87.42,85.22 87.42,80.67 ; J401.2@91.04,75.94 90.061,76.919 90.061,78.029 87.42,80.67
VIB_FILT: C401.1 R401.2 R402.1 U401.3 | length 11.9
  Bottom Layer w0.25: R401.2@74.183,88.91 74.182,88.908 74.182,86.182 C401.1@74.18,86.18 74.17,86.17 74.17,83.79 R402.1@74.16,83.78 74.16,83.68 77.615,80.225 U401.3@79.356,80.225
VIB_SENSOR_RAW: D401.1 J401.1 | length 12.5
  Bottom Layer w0.25: D401.1@87.355,88.92 87.355,88.895 91.04,85.21 J401.1@91.04,77.94
VIB_VTH: C402.1 RV401.2 U401.2 | length 21.4
  Top Layer w0.25: RV401.2@80,68.995 80,63.48 C402.1@80.01,63.47
  Bottom Layer w0.25: U401.2@79.356,78.955 76.835,78.955 74.36,76.48 74.36,74.635 RV401.2@80,68.995
VIBRATION_RAW: U401.1 U504.12 | length 37.3
  Top Layer w0.25: v1(71.31,47.51) 71.31,67.91 v1(77.94,74.54)
  Bottom Layer w0.25: v1(71.31,47.51) 71.33,47.53 71.33,51.29 U504.12@71.35,51.31 ; v1(77.94,74.54) 79.356,75.956 U401.1@79.356,77.685
pads on no net: D102.4 D103.2 D103.4 D601.3 D601.4 J301.2 J301.4 U101.4 U202.7 U304.3 U306.1 U501.1 U501.2 U503.1 U504.1 U504.13 U601.16 U601.19 U603.1

## Polygon pours and split planes (outlines as drawn)
GND on GND (split plane): 99.49,0.51 0.51,0.51 0.51,99.49 99.49,99.49
+5V on POWER (split plane): 99.49,0.51 0.51,0.51 0.51,99.49 99.49,99.49

## Text inside footprints (layer, text, board x,y; h text height)
C303: Bottom Overlay "REFDES" at 43.987,51.135 h1.27 r180
U504: Bottom Overlay "REFDES" at 71.35,55.895 h0.8 r90; Bottom Overlay "*" at 65.838,56.606 h0.8 r90; Bottom 3D Body "*" at 65.838,56.606 h0.8 r90
U605: Bottom Overlay "*" at 93.032,20.961 h0.8 r270; Bottom 3D Body "*" at 93.032,20.961 h0.8 r270